# Altium PCB PCB1.PcbDoc (part 2 of 2)
Units mm, origin at the board's own origin, x right, y up, seen from the top; angles counter-clockwise.
Board outline 84.97 x 56 mm, 6 copper layers (Top Layer, L2_GND, L3-PWR, L4-SGN, L5-GND, Bottom Layer), stack 1.452 mm thick; 132 components, 108 nets, 851 pads, 433 vias.
Unrouted connection lines stored in the file: 212.
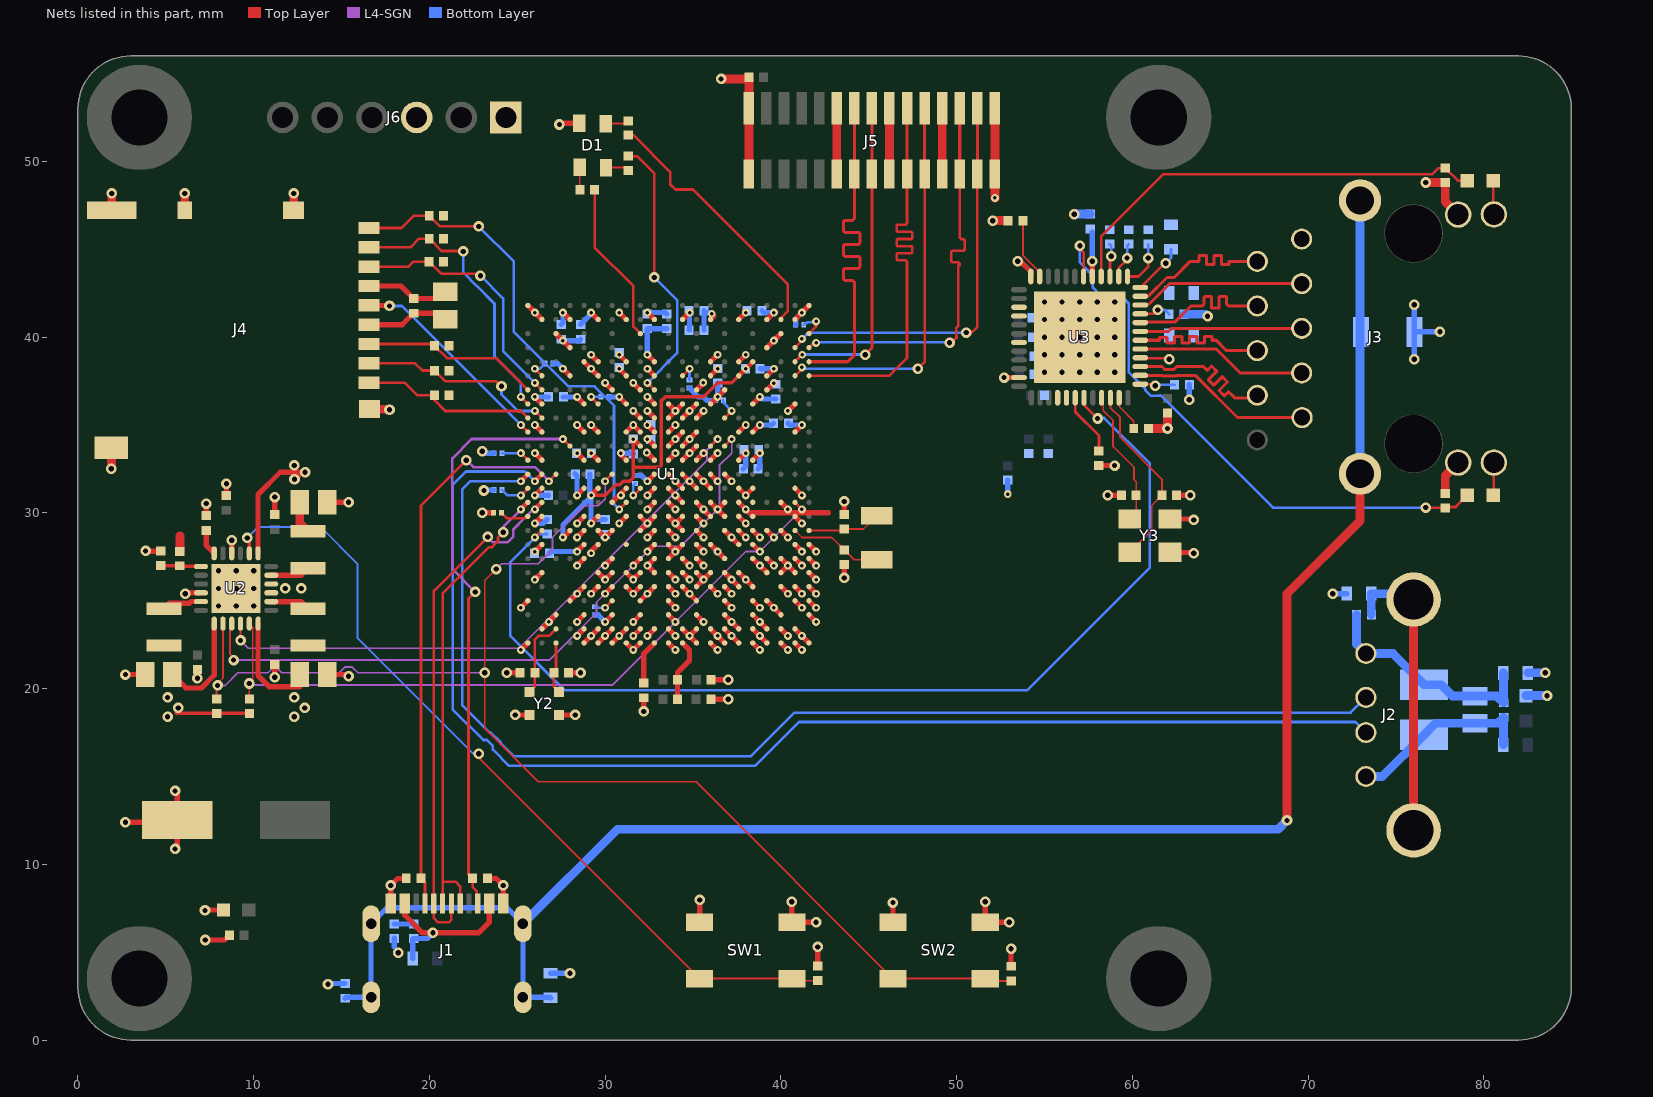
[diagram p6: the nets of this part, all layers, seen from the top]

## Via types
v1: diameter 0.45, hole 0.2, Top Layer to Bottom Layer, 177 vias
v2: diameter 0.6, hole 0.3, Top Layer to Bottom Layer, 161 vias
v3: diameter 0.45, hole 0.2, Top Layer to L2_GND, 59 vias
v4: diameter 0.5, hole 0.3, Top Layer to Bottom Layer, tented both sides, 34 vias
v5: diameter 0.6, hole 0.3, Top Layer to L2_GND, 2 vias

## Nets (pads, with @x,y where several pads share a name; then routed paths per layer and width w, separated by ;. In a path a pad name is that pad's centre, name@x,y a point inside that pad or via, vN(x,y) a via of type N, cw(c..) or ccw(c..) an arc to the next point about the centre after c; other vN are vias at no path point) (continued)
GND: C1.1 C2.1 C4.1 C5.1 C6.1 C7.1 C8.1 C9.1 C10.1 C11.1 C12.1 C13.1 C14.1 C15.1 C16.1 C17.1 C18.1 C19.1 C20.1 C21.1 C22.1 C23.1 C24.1 C25.1 C26.1 C27.1 C28.1 C29.2 C30.1 C31.1 C32.1 C33.1 C34.1 C38.1 C40.1 C41.2 C42.1 C43.2 C44.1 C45.2 C46.1 C47.1 C48.1 C49.2 C50.2 C51.1 C52.2 C53.1 C54.2 C55.1 C56.1 C57.1 C58.1 C59.1 FB2.2 FB4.2 FB5.1 J1.A1/B12 J1.B1/A12 J3.1 J4.G1 J4.G2 J4.G3 J4.G5 J4.G6 J4.P6 J5.1 J5.4 J5.7 J5.10 J6.1 R2.2 R3.2 R4.2 R5.1 R6.1 R7.1 R8.1 R9.2 R11.1 R12.2 R13.1 R15.1 R19.2 R32.1 R33.1 R34.1 R35.1 R36.1 SW1.1 SW1.2 SW2.1 SW2.2 U1.A1 U1.A25 U1.AA1 U1.AA4 U1.AA6 U1.AA8 U1.AA25 U1.B2 U1.B16 U1.B24 U1.C3 U1.C23 U1.D4 U1.D20 U1.D22 U1.E2 U1.E5 U1.E8 U1.E10 U1.E12 U1.E14 U1.E16 U1.E18 U1.E21 U1.F1 U1.F9 U1.F20 U1.G2 U1.G3 U1.G5 U1.G7 U1.G9 U1.H1 U1.H5 U1.H8 U1.H10 U1.H14 U1.H16 U1.H18 U1.H21 U1.J1 U1.J3 U1.J5 U1.J7 U1.J9 U1.J10 U1.J16 U1.K2 U1.K8 U1.K10 U1.K11 U1.K13 U1.K15 U1.K21 U1.L1 U1.L3 U1.L5 U1.L7 U1.L8 U1.L12 U1.L14 U1.L16 U1.L17 U1.L18 U1.M2 U1.M5 U1.M6 U1.M8 U1.M11 U1.M13 U1.M15 U1.M17 U1.M18 U1.N1 U1.N2 U1.N4 U1.N7 U1.N9 U1.N10 U1.N12 U1.N14 U1.N16 U1.N18 U1.P2 U1.P5 U1.P8 U1.P11 U1.P13 U1.P18 U1.P24 U1.R1 U1.R3 U1.R6 U1.R7 U1.R10 U1.R11 U1.R19 U1.T2 U1.T5 U1.T9 U1.T11 U1.T12 U1.T21 U1.U1 U1.U3 U1.U8 U1.U10 U1.U11 U1.U12 U1.U14 U1.U16 U1.U18 U1.V2 U1.V4 U1.V7 U1.V9 U1.V20 U1.V22 U1.V24 U1.W1 U1.W3 U1.W5 U1.W11 U1.W23 U1.Y2 U1.Y5 U1.Y7 U1.Y10 U1.Y12 U1.Y24 U2.9 U2.10 U2.16 U2.22 U2.25 U3.49 Y2.3 Y2.4 Y3.2 Y3.4 | length 185.7
  Top Layer w0.3: v2(2.7,12.4) 5.525,12.4 C29.2@5.65,12.525 ; v2(2.7,20.8) C41.2@3.825,20.8 ; v2(3.847,27.832) 3.859,27.82 R19.2@4.7,27.82 ; v2(5.528,10.875) 5.65,10.997 C29.2@5.65,12.525 ; v2(5.528,14.175) 5.65,14.053 C29.2@5.65,12.525 ; C29.2@5.65,12.4 C29.2@5.65,12.525 ; v2(6.1,25.4) 6.15,25.45 U2.22@7,25.45 ; v2(6.8,20.588) C40.1@6.8,21.08 ; v2(7.248,5.694) 7.253,5.7 8.345,5.7 C31.1@8.616,5.971 ; v2@7.3,7.4 C30.1@8.28,7.4 ; C47.1@7.3,29.84 v2(7.3,30.529) ; C46.1@8.446,30.989 v2(8.446,31.654) ; U2.16@8.75,27.7 v2@8.75,28.4 ; v2(11.2,20.65) C42.1@11.2,21.38 ; C44.1@11.2,29.9 v2(11.2,30.9) ; C43.2@14.175,20.8 15.4,20.8 v2(15.4,20.7) ; C45.2@14.175,30.6 v2(15.4,30.6) ; J4.P6@16.572,42.91 18.39,42.91 C56.1@19.1,42.2 20.525,42.2 C57.1@20.9,42.575 ; J4.G5@16.6,35.91 J4.G5@16.61,35.9 ; J1.A1/B12@17.8,7.765 v2(17.8,8.8) 18.2,9.2 C32.1@18.68,9.2 ; v2(23,30) R2.2@23.64,30 ; C33.1@23.3,9.2 23.8,9.2 v2(24.2,8.8) J1.B1/A12@24.2,7.765 ; v2(24.4,20.9) C2.1@25.16,20.9 ; v2@24.902,18.502 Y2.4@25.684,18.502 ; v3(25.2,22.2) U1.A1@25.6,22.6 ; U1.A25@25.6,41.8 v1(26,41.4) U1.B24@26.4,41 ; v1(26,35) U1.B16@26.4,34.6 ; U1.B2@26.4,23.4 v3(26.8,23.8) U1.C3@27.2,24.2 ; U1.C23@27.2,40.2 v1(27.6,39.8) U1.D22@28,39.4 ; Y2.3@27.384,18.502 v2@28.298,18.502 ; v1(27.6,38.2) U1.D20@28,37.8 ; C8.1@27.92,20.9 v2(28.6,20.9) ; U1.D4@28,25 v3(28.4,25.4) U1.E5@28.8,25.8 ; v3(28.4,23) U1.E2@28.8,23.4 ; v1(28.4,27.8) U1.E8@28.8,28.2 ; v1(28.4,29.4) U1.E10@28.8,29.8 ; v1(28.4,31) U1.E12@28.8,31.4 ; v1(28.4,33.4) U1.E14@28.8,33 ; v1(28.4,35) U1.E16@28.8,34.6 ; v1(28.4,36.6) U1.E18@28.8,36.2 ; U1.E21@28.8,38.6 v1(29.2,38.2) U1.F20@29.6,37.8 ; U1.F1@29.6,22.6 v3(30,23) U1.G2@30.4,23.4 ; U1.F9@29.6,29 v1(30,28.6) U1.G9@30.4,29 ; v3(30,23.8) U1.G3@30.4,24.2 ; v3(30,25.4) U1.G5@30.4,25.8 ; v3(30,27) U1.G7@30.4,27.4 ; v3(30.8,29.4) U1.H10@31.2,29.8 ; v1(30.8,36.6) U1.H18@31.2,36.2 ; v1(30.8,39) U1.H21@31.2,38.6 ; v1(30.9,33.4) 30.85,33.35 U1.H14@31.2,33 ; U1.H1@31.2,22.6 v3(31.6,22.2) U1.J1@32,22.6 ; U1.H5@31.2,25.8 v3(31.6,25.4) U1.J5@32,25.8 ; U1.H16@31.2,34.6 v1(31.6,35) U1.J16@32,34.6 ; v3(31.6,23.8) U1.J3@32,24.2 ; v3(31.6,27) U1.J7@32,27.4 ; U1.J9@32,29 v3(32.4,29.4) ; U1.J10@32,29.8 v3(32.4,29.4) ; v2(32.2,18.7) C4.1@32.2,19.48 ; v3(32.4,23) U1.K2@32.8,23.4 ; v3(32.4,27.8) U1.K8@32.8,28.2 ; v3(32.4,30.2) U1.K11@32.8,30.6 ; v1(32.4,31.8) U1.K13@32.8,32.2 ; v1(32.4,34.2) U1.K15@32.8,33.8 ; v1(32.4,39) U1.K21@32.8,38.6 ; U1.K10@32.8,29.8 v3(32.4,29.4) ; U1.L1@33.6,22.6 v3(34,22.2) ; U1.L3@33.6,24.2 v3(34,23.8) ; U1.L5@33.6,25.8 v3(34,25.4) ; U1.L7@33.6,27.4 v3(34,27.8) ; U1.L8@33.6,28.2 v3(34,27.8) ; U1.L12@33.6,31.4 v3(34,31) U1.M11@34.4,30.6 ; U1.L14@33.6,33 v3(34,33.4) ; U1.L16@33.6,34.6 v3(34,35) ; U1.L17@33.6,35.4 v3(34,35.8) ; U1.L18@33.6,36.2 v3(34,35.8) ; U1.M2@34.4,23.4 v3(34.8,23) ; U1.M5@34.4,25.8 v3(34.8,25.4) U1.N4@35.2,25 ; U1.M6@34.4,26.6 v3(34.8,26.2) ; U1.M8@34.4,28.2 v3(34,27.8) ; U1.M13@34.4,32.2 v3(34.8,31.8) U1.N12@35.2,31.4 ; U1.M15@34.4,33.8 v3(34.8,34.2) U1.N16@35.2,34.6 ; U1.M17@34.4,35.4 v3(34.8,35.8) U1.N18@35.2,36.2 ; U1.M18@34.4,36.2 v3(34,35.8) ; U1.N1@35.2,22.6 v3(34.8,23) ; U1.N2@35.2,23.4 v3(34.8,23) ; U1.N7@35.2,27.4 v3(35.6,27) ; U1.N9@35.2,29 v3(35.6,28.6) ; U1.N10@35.2,29.8 v3(35.6,29.4) ; U1.N14@35.2,33 v3(35.6,33.4) ; SW1.1@35.375,6.7 v2(35.375,7.975) ; U1.P2@36,23.4 v3(36.4,23) U1.R1@36.8,22.6 ; U1.P5@36,25.8 v1(36.4,25.4) ; U1.P8@36,28.2 v1(36.4,27.8) U1.R7@36.8,27.4 ; U1.P11@36,30.6 v3(36.4,30.2) ; U1.P13@36,32.2 v3(36.4,31.8) ; U1.P18@36,36.2 v3(36.4,36.599) ; U1.P24@36,41 36.196,41.196 v1(36.064,41.329) ; R11.1@36.01,20.5 v2(37,20.5) ; C7.1@36.02,19.4 v2(37,19.4) ; v3(36.4,36.599) U1.R19@36.8,37 ; U1.R3@36.8,24.2 v3(37.2,23.8) U1.T2@37.6,23.4 ; U1.R6@36.8,26.6 v1(37.2,26.2) U1.T5@37.6,25.8 ; U1.R10@36.8,29.8 v3(36.4,30.2) ; U1.R11@36.8,30.6 v3(36.4,30.2) ; U1.T9@37.6,29 v3(38,28.6) ; U1.T11@37.6,30.6 38.2,30 42.7,30 ; U1.T12@37.6,31.4 v3(38,31) U1.U12@38.4,31.4 ; U1.T21@37.6,38.6 v1(38,39) ; v3(38,30.2) U1.U10@38.4,29.8 ; U1.U1@38.4,22.6 v3(38.8,22.2) ; U1.U3@38.4,24.2 v3(38.8,23.8) U1.V2@39.2,23.4 ; U1.U8@38.4,28.2 v3(38.8,27.8) ; U1.U14@38.4,33 v1(38.8,33.4) ; U1.U16@38.4,34.6 v1(38.8,35) ; U1.U18@38.4,36.2 v1(38.8,36.6) ; U1.V4@39.2,25 v3(39.6,24.6) U1.W3@40,24.2 ; U1.V7@39.2,27.4 v3(39.6,27) ; U1.V9@39.2,29 v3(39.6,28.6) ; U1.V20@39.2,37.8 v1(39.6,38.2) ; U1.V22@39.2,39.4 v1(39.6,39.8) U1.W23@40,40.2 ; U1.V24@39.2,41 v1(39.6,41.4) ; U1.W1@40,22.6 v3(40.4,22.2) ; U1.W5@40,25.8 v3(40.4,25.4) ; U1.W11@40,30.6 v3(40.4,30.2) ; v2(40.625,7.875) SW1.2@40.625,6.7 v2(42,6.7) ; U1.Y2@40.8,23.4 v3(41.2,23) U1.AA1@41.6,22.6 ; U1.Y5@40.8,25.8 v3(41.2,25.4) ; U1.Y7@40.8,27.4 v3(41.2,27) ; U1.Y10@40.8,29.8 v3(41.2,29.4) ; U1.Y12@40.8,31.4 v1(41.2,31) ; U1.Y24@40.8,41 v1(41.2,41.4) U1.AA25@41.6,41.8 ; U1.AA4@41.6,25 v3(42,24.6) ; U1.AA6@41.6,26.6 v3(42,26.2) ; U1.AA8@41.6,28.2 v3(42,27.8) ; C58.1@42.1,4.22 v2(42.1,5.3) ; v2(43.6,26.3) C5.1@43.6,27.06 ; C6.1@43.6,29.92 43.6,30.64 v2(43.61,30.65) ; SW2.1@46.375,6.7 v2(46.375,7.825) ; v2(51.625,7.875) SW2.2@51.625,6.7 v2(53,6.7) ; C59.1@53.1,4.2 v2(53.1,5.2) ; v2(58.6,31) C53.1@59.38,31 ; v2@61.9,34.9 v2(62,34.8) ; Y3.4@62.15,27.75 v2@63.45,27.75 ; Y3.2@62.15,29.65 v2@63.45,29.65 ; C54.2@62.52,31 v2(63.3,31)
  Top Layer w0.5: v2(1.9,32.504) J4.G6@1.9,33.71 ; J4.G3@1.925,47.21 v2(1.925,48.175) ; J4.G2@6.075,47.21 v2(6.075,48.175) ; J4.G1@12.275,47.21 v2(12.275,48.175) ; J4.G5@16.61,35.9 v2@17.8,35.9 ; J5.10@43.178,49.272 J5.10@43.178,53.023 ; J5.7@46.178,49.272 J5.7@46.178,53.023 ; J5.4@49.178,49.272 J5.4@49.178,53.023 ; v2(52.051,46.629) C48.1@52.931,46.629 ; v1(52.178,47.922) J5.1@52.178,49.272 J5.1@52.178,53.023 ; C52.2@60.92,34.8 v2(62,34.8) R36.1@62,35.69
  Bottom Layer w0.3: v2@14.32,3.22 C34.1@15.2,3.22 ; 18,5.3 R15.1@18,5.79 ; v2(23,33.5) 23.1,33.4 R4.2@23.67,33.4 ; v2(23.1,31.273) 23.1,31.3 R3.2@23.67,31.3 ; C16.1@26.82,27.7 26.92,27.8 v1(28.4,27.8) ; FB2.2@26.9,3.8 v2(28,3.8) ; R8.1@27.03,38.5 27.3,38.5 v1(27.6,38.2) ; v1(27.6,39.8) 28.52,39.8 C23.1@28.6,39.88 ; C27.1@27.62,36.6 v1(28.4,36.6) ; C17.1@28.28,32.22 28.4,32.1 v1(28.4,31) ; R12.2@29.4,24.2 29.6,24.2 v3(30,23.8) ; R7.1@30.23,36.6 v1(30.8,36.6) ; v1(30.9,33.4) 31.56,33.4 C18.1@31.6,33.36 ; R13.1@31.7,32.13 32.07,32.13 v1(32.4,31.8) ; v1(32.4,39) C25.1@32.4,40.48 C9.1@33.5,40.48 ; R6.1@34.8,37.1 35.3,36.6 35.6,36.6 35.8,36.4 R5.1@36.27,36.4 ; C10.1@35.62,40.4 C26.1@35.62,41.5 35.72,41.4 36.064,41.4 v1(36.064,41.329) ; 36.34,36.664 36.4,36.724 C24.1@36.4,37.38 ; C11.1@38.7,32.5 38.8,32.6 v1(38.8,33.4) ; v1(38.8,35) 39.48,35 C22.1@39.58,35.1 ; v1(38.8,36.6) 38.92,36.48 C15.1@39.7,36.48 ; C20.1@38.82,38.2 v1(39.6,38.2) ; C12.1@38.92,41.5 39.02,41.4 v1(39.6,41.4) ; R9.2@40.84,40.7 40.84,41.04 v1(41.2,41.4) ; v2(63.24,36.44) C49.2@63.24,37.3 ; v2(71.4,25.4) FB5.1@72.2,25.4 ; v2(76.048,38.748) C55.1@76.048,40.3 ; v2(76.048,41.848) C55.1@76.048,40.3 ; v2(77.5,40.3) C55.1@76.048,40.3
  Bottom Layer w0.5: v2(56.7,47) C51.1@57.6,47 ; C50.2@62.94,41.3 64.17,41.3 v2(64.28,41.19) ; C38.1@82.4,19.6 v5(83.6,19.6) ; FB4.2@82.5,20.9 v5(83.5,20.9)
  other v2: 14.228,3.175 18.228,4.975 7.228,7.375 24.885,18.502 28.3,18.5 11.8,25.7 12.7,25.7 63.5,27.7 8.757,28.447 63.5,29.6 17.728,35.875
  other v4: 8,24.7 9,24.7 10,24.7 8,25.7 9,25.7 10,25.7 8,26.7 9,26.7 10,26.7 55,38 56,38 57,38 58,38 59,38 55,39 56,39 57,39 58,39 59,39 55,40 56,40 57,40 58,40 59,40 55,41 56,41 57,41 58,41 59,41 55,42 56,42 57,42 58,42 59,42
GND_USBA: C34.2 C55.2 FB2.1 J1.25 J3.0 | length 103.8
  Top Layer w0.5: v2(68.8,12.5) 68.8,25.4 72.961,29.561 J3.0@72.961,32.225
  Bottom Layer w0.3: C34.2@15.2,2.38 15.255,2.435 J1.25@16.68,2.435 J1.25@16.68,6.615 17.6,7.535 24.4,7.535 J1.25@25.32,6.615 J1.25@25.32,2.435 26.865,2.435 FB2.1@26.9,2.4
  Bottom Layer w0.5: J1.25@25.32,6.615 30.705,12 68.3,12 v2(68.8,12.5) ; J3.0@72.961,32.225 J3.0@72.961,47.775
GND_USBB: C39.2 FB5.2 J2.0 | length 16.9
  Top Layer w0.5: J2.0@76,11.93 J2.0@76,25.07
  Bottom Layer w0.5: C39.2@73.6,24.2 FB5.2@73.6,25.4 75.67,25.4 J2.0@76,25.07
LED1: R20.1 R29.1 U3.18 | length 33.7
  Top Layer w0.15: v2(57.016,45.197) 56.975,45.156 56.975,45.061 57.225,44.811 U3.18@57.225,43.45 ; v2(76.7,30.3) 76.71,30.29 R29.1@77.8,30.29 77.847,30.338 78.4,30.338 R20.1@79.062,31
  Bottom Layer w0.15: v2(57.016,45.197) 57.016,44.256 57.5,43.773 57.5,43.736 57.55,43.686 57.75,43.486 57.75,42.813 58.138,42.425 59.275,42.425 59.8,41.9 59.8,40.606 59.8,38 60.732,37.068 60.732,36.999 61.068,36.663 61.545,36.663 61.582,36.7 61.6,36.7 68,30.3 v2(76.7,30.3)
LED2: R21.1 R30.1 U3.16 | length 25
  Top Layer w0.15: U3.16@58.225,43.45 58.225,45.725 61.775,49.275 62.836,49.275 77.075,49.275 77.42,49.62 R30.1@77.8,49.62 78.52,48.9 R21.1@79.062,48.9
LED_BLUE: R45.1 U1.W24 | length 15.2
  Top Layer w0.15: R45.1@31.3,51.49 31.61,51.49 33.7,49.4 33.7,48.7 34,48.4 35,48.4 40.4,43 40.4,41.5 40,41.1 U1.W24@40,41
LED_GREEN: R46.1 U1.J23 | length 9.3
  Top Layer w0.15: R46.1@29.4,48.4 29.4,45.1 31.6,42.9 31.6,40.6 U1.J23@32,40.2
LED_RED: R47.1 U1.K19 | length 15.6
  Top Layer w0.15: R47.1@31.3,50.31 31.31,50.3 31.8,50.3 32.8,49.3 v2(32.8,43.4) ; v1(32.4,37.4) U1.K19@32.8,37
  Bottom Layer w0.15: v1(32.4,37.4) 34.1,39.1 34.1,42.1 v2(32.8,43.4)
LPM: U1.P15 U2.4 | length 34.1
  Top Layer w0.1: v2(9.25,22.74) U2.4@9.25,23.7
  Top Layer w0.15: U1.P15@36,33.8 v1(36.4,34.2)
  L4-SGN w0.1: v2(9.25,22.74) 9.69,22.3 25.1,22.3 35.8,33 35.8,33.6 v1(36.4,34.2)
MIPI_CK_N: J5.8 U1.Y21 | length 18.3
  Top Layer w0.15: U1.Y21@40.813,38.6 40.81,38.604 41.006,38.8 41.013,38.8 v1(41.213,39)
  Top Layer w0.175: v2(44.8,39) 45.178,39.378 J5.8@45.178,49.272 J5.8@45.178,53.023
  Bottom Layer w0.175: v1(41.213,39) 42.9,39 v2(44.8,39)
MIPI_CK_P: J5.9 U1.AA21 | length 21.2
  Top Layer w0.175: U1.AA21@41.6,38.6 43.8,38.6 44.178,38.978 44.178,43.043 44.178,43.13 44.075,43.233 43.638,43.233 43.57,43.301 43.57,43.848 43.638,43.916 44.426,43.916 44.495,43.984 44.495,44.531 44.426,44.599 43.638,44.599 43.57,44.667 43.57,45.214 43.638,45.282 44.426,45.282 44.495,45.35 44.495,45.897 44.426,45.965 43.638,45.965 43.57,46.033 43.57,46.58 43.638,46.648 44.075,46.648 44.178,46.75 44.178,47.452 J5.9@44.178,49.272 J5.9@44.178,53.023
MIPI_D0_N: J5.2 U1.Y22 | length 23.5
  Top Layer w0.15: U1.Y22@40.8,39.4 41.2,39.8 v1(41.2,39.9) ; v2(50.553,40.258) 50.553,40.166 50.766,40.166 51.178,40.578 J5.2@51.178,49.272
  Top Layer w0.175: J5.2@51.178,49.272 J5.2@51.178,53.023
  Bottom Layer w0.15: v1(41.2,39.9) 41.558,40.258 50.224,40.258 50.305,40.258 v2(50.553,40.258)
MIPI_D0_P: J5.3 U1.AA22 | length 23.3
  Top Layer w0.15: U1.AA22@41.6,39.4 41.95,39.75 42,39.7 v1(42,39.676) ; v2(49.6,39.683) 49.6,39.8 49.826,39.8 49.996,39.97 49.996,40.022 49.978,40.041 49.978,40.517 50.091,40.63 50.091,44.088 50.14,44.138 50.178,44.175 ; 50.178,44.1 50.178,44.175 ; J5.3@50.178,49.272 50.178,45.8 50.178,45.667 50.266,45.579 50.393,45.579 50.459,45.513 50.459,44.987 50.393,44.921 49.757,44.921 49.691,44.855 49.691,44.329 49.757,44.263 50.09,44.263 50.178,44.175
  Top Layer w0.175: J5.3@50.178,49.272 J5.3@50.178,53.023
  Bottom Layer w0.15: v1(42,39.676) 42,39.7 49.5,39.7 49.541,39.741 v2(49.6,39.683)
MIPI_D1_N: J5.5 U1.Y20 | length 22.3
  Top Layer w0.15: U1.Y20@40.813,37.8 41.213,38.2 41.213,38.286 41.199,38.286 v1@41.199,38.282 ; v2(47.8,38.2) 48.178,38.578 J5.5@48.178,49.272
  Top Layer w0.175: J5.5@48.178,49.272 J5.5@48.178,53.023
  Bottom Layer w0.15: v1@41.199,38.282 41.199,38.286 41.213,38.286 41.213,38.2 v2(47.8,38.2)
  other v1: 41.198,38.282
MIPI_D1_P: J5.6 U1.AA20 | length 25.5
  Top Layer w0.15: U1.AA20@41.6,37.8 46.156,37.8 47.178,38.822 47.178,43.4 ; 47.178,42.566 47.178,43.4 ; 47.178,46.765 J5.6@47.178,49.272 ; 47.178,46.9 47.178,46.679 47.178,46.479 47.09,46.391 46.635,46.391 46.594,46.35 46.594,46.027 46.635,45.987 47.428,45.987 47.468,45.946 47.468,45.623 47.428,45.583 46.635,45.583 46.594,45.542 46.594,45.219 46.635,45.179 47.428,45.179 47.468,45.138 47.468,44.815 47.428,44.775 46.635,44.775 46.594,44.734 46.594,44.411 46.635,44.371 47.09,44.371 47.178,44.283 47.178,43.4
  Top Layer w0.175: J5.6@47.178,49.272 J5.6@47.178,53.023
NetC48_2: C48.2 U3.23 | length 3.8
  Top Layer w0.1: C48.2@53.721,46.579 C48.2@53.771,46.629 ; C48.2@53.871,46.729 C48.2@53.771,46.629 ; U3.23@54.725,43.45 54.725,43.699 54.3,44.124 53.771,44.654 C48.2@53.771,46.629
NetC52_1: C52.1 U3.47 | length 2.1
  Top Layer w0.1: U3.47@59.25,36.55 59.25,36.05 60.08,35.22 C52.1@60.08,34.8
NetD1_1: D1.1 R45.2 | length 1.3
  Top Layer w0.1: D1.1@30.025,52.15 31.14,52.15 R45.2@31.3,52.31
NetD1_3: D1.3 R46.2 | length 1.3
  Top Layer w0.1: D1.3@28.55,49.675 28.55,48.43 R46.2@28.58,48.4
NetD1_4: D1.4 R47.2 | length 1.3
  Top Layer w0.1: D1.4@30.05,49.65 31.14,49.65 R47.2@31.3,49.49
NetJ3_12: J3.12 R21.2 | length 1.9
  Top Layer w0.15: R21.2@80.538,48.9 80.538,47.02 J3.12@80.571,46.987
NetJ3_14: J3.14 R20.2 | length 1.9
  Top Layer w0.15: R20.2@80.538,31 80.571,31.034 J3.14@80.571,32.862
NetR2_1: R2.1 U1.A10 | length 1.7
  Top Layer w0.15: R2.1@24.1,30 24.3,29.8 24.402,29.698 24.992,29.698 25.408,29.698 25.51,29.8 U1.A10@25.6,29.8
NetR3_1: R3.1 U1.A12 | length 1.8
  Top Layer w0.15: v1(25.2,31) U1.A12@25.6,31.4
  Bottom Layer w0.15: R3.1@24.13,31.3 24.43,31 v1(25.2,31)
NetR4_1: R4.1 U1.A14 | length 1.6
  Top Layer w0.15: v1(25.2,33.4) U1.A14@25.6,33
  Bottom Layer w0.15: R4.1@24.13,33.4 v1(25.2,33.4)
NetR5_2: R5.2 U1.R17 | length 1.4
  Top Layer w0.15: U1.R17@36.8,35.4 v1(37.2,35.8)
  Bottom Layer w0.15: R5.2@36.73,36.4 36.73,36.27 v1(37.2,35.8)
NetR6_2: R6.2 U1.M20 | length 1.2
  Top Layer w0.15: U1.M20@34.4,37.8 v1(34.8,38.2)
  Bottom Layer w0.15: R6.2@34.8,37.56 v1(34.8,38.2)
NetR7_2: R7.2 U1.F18 | length 1.1
  Top Layer w0.15: v1(29.2,36.6) U1.F18@29.6,36.2
  Bottom Layer w0.15: v1(29.2,36.6) R7.2@29.77,36.6
NetR8_2: R8.2 U1.B20 | length 1.3
  Top Layer w0.15: v1(26,38.2) U1.B20@26.4,37.8
  Bottom Layer w0.15: v1(26,38.2) 26.27,38.2 R8.2@26.57,38.5
NetR9_1: R9.1 U1.AA23 | length 1.6
  Top Layer w0.15: U1.AA23@41.6,40.2 42,40.6 42,40.7 v1(42,40.896)
  Bottom Layer w0.15: R9.1@41.3,40.7 41.4,40.8 41.464,40.8 41.51,40.846 41.95,40.846 v1(42,40.896)
NetR12_1: R12.1 U1.G4 | length 1.2
  Top Layer w0.15: v1(30,24.6) U1.G4@30.4,25
  Bottom Layer w0.15: R12.1@29.4,24.66 29.46,24.6 v1(30,24.6)
NetR13_2: R13.2 U1.J12 | length 1.3
  Top Layer w0.15: v1(31.6,31) U1.J12@32,31.4
  Bottom Layer w0.15: v1(31.6,31) 31.6,31.57 R13.2@31.7,31.67
NetR18_1: R18.1 R19.1 U2.19 | length 2.3
  Top Layer w0.2: R19.1@4.7,27 R18.1@5.79,27 ; R18.1@5.8,27.09 5.94,26.95 U2.19@7,26.95
NetR24_1: R24.1 U3.42 | length 3.6
  Top Layer w0.15: U3.42@56.75,36.55 56.75,35.75 58.1,34.4 R24.1@58.1,33.51
NetR27_1: R27.1 U3.14 | length 2
  Top Layer w0.15: U3.14@59.225,43.45 59.225,43.925 v2@59.7,44.4
  Bottom Layer w0.15: v2(59.7,44.5) 59.7,45.19 R27.1@59.8,45.29
NetR28_1: R28.1 U3.13 | length 2.7
  Top Layer w0.15: U3.13@59.725,43.45 60.35,43.45 60.9,44 v2(60.9,44.5)
  Bottom Layer w0.15: v2(60.9,44.5) R28.1@60.9,45.29
NetR31_1: R31.1 U3.15 | length 1.8
  Top Layer w0.15: U3.15@58.725,43.45 58.725,44.425 v2@58.8,44.5
  Bottom Layer w0.15: R31.1@58.7,45.29 58.8,45.19 v2(58.8,44.6)
NRST: C59.2 R17.1 SW2.3 SW2.4 U1.G13 U2.2 | length 75.4
  Top Layer w0.1: R17.1@7.885,19.405 7.885,20.238 8.25,20.603 U2.2@8.25,23.7 ; v2(23.8,26.8) 23.15,26.15 v2(23.15,20.9) 23.15,17.75 26.2,14.7 35.175,14.7 SW2.3@46.375,3.5 SW2.4@51.625,3.5 51.765,3.36 C59.2@53.1,3.36
  Top Layer w0.15: v1(30,31.8) U1.G13@30.4,32.2
  L4-SGN w0.1: v2(7.946,20.178) 8.378,20.178 9.1,20.9 10.814,20.9 11.014,21.1 11.386,21.1 11.586,20.9 14.864,20.9 15.187,21.223 15.613,21.223 15.936,20.9 v2(23.15,20.9) ; v2(23.8,26.8) 24.1,27.1 26.2,27.1 27,27.9 27,28.6 28.8,30.4 29.6,30.4 30,30.8 v1(30,31.8)
NRST_OUT: R1.1 U1.B9 U3.43 | length 59.6
  Top Layer w0.15: v1(26,28.6) U1.B9@26.4,29 ; U3.43@57.25,36.55 57.25,36.141 v2(58.021,35.37)
  Bottom Layer w0.15: R1.1@26.7,28.8 26.2,28.8 v1(26,28.6) 24.6,27.2 24.6,23 27.7,19.9 54,19.9 61,26.9 61,32.8 58.4,35.4 58.051,35.4 v2(58.021,35.37)
nSTART: C58.2 SW1.3 SW1.4 U2.14 | length 46.9
  Top Layer w0.1: v2(22.8,16.3) 22.8,16.075 SW1.3@35.375,3.5 SW1.4@40.625,3.5 40.745,3.38 C58.2@42.1,3.38
  Top Layer w0.2: U2.14@9.75,27.7 v2@9.75,28.55
  Bottom Layer w0.1: v2(9.628,28.575) 10.253,29.2 13.8,29.2 15.9,27.1 15.9,22.9 22.5,16.3 v2(22.8,16.3)
SDMMC1_CD: J4.G4 R42.1 U1.H11 | length 27.6
  Top Layer w0.15: J4.G4@16.572,46.21 18.41,46.21 19.1,46.9 R42.1@19.99,46.9 20.59,46.3 v2(22.8,46.3) ; v1(30.8,30.2) U1.H11@31.2,30.6
  Bottom Layer w0.15: v2(22.8,46.3) 24.8,44.3 24.8,40.3 27.9,37.2 29.4,37.2 30.5,36.1 30.5,32.007 30.5,31.593 30.5,30.5 v1(30.8,30.2)
SDMMC1_CK: J4.P5 U1.A16 | length 12.1
  Top Layer w0.15: v1(25.2,35) U1.A16@25.6,34.6
  Top Layer w0.3: J4.P5@16.572,41.81 16.582,41.8 v2@17.8,41.8
  Bottom Layer w0.15: v2(17.728,41.775) 18.425,41.775 v1(25.2,35)
SDMMC1_CMD: J4.P3 R41.1 U1.A19 | length 10.1
  Top Layer w0.15: J4.P3@16.572,39.61 20.18,39.61 R41.1@20.29,39.5 20.99,38.8 23.8,38.8 U1.A19@25.6,37
SDMMC1_DAT0: J4.P7 R37.1 U1.B19 | length 14.7
  Top Layer w0.15: J4.P7@16.572,44.01 18.81,44.01 19.1,44.3 R37.1@19.98,44.3 20.68,43.6 22.8,43.6 v2(22.9,43.5) ; v1(26,37.4) U1.B19@26.4,37
  Bottom Layer w0.15: v2(22.9,43.5) 24.2,42.2 24.2,39.2 v1(26,37.4)
SDMMC1_DAT1: J4.P8 R38.1 U1.A18 | length 16.1
  Top Layer w0.15: J4.P8@16.572,45.11 18.91,45.11 19.4,45.6 R38.1@19.99,45.6 20.69,44.9 21.903,44.9 v2(21.928,44.875) ; v1(25.2,36.6) U1.A18@25.6,36.2
  Bottom Layer w0.15: v2(21.928,44.875) 21.928,43.672 22.325,43.275 22.325,43.262 22.662,42.925 22.675,42.925 23.7,41.9 23.7,38.9 25.2,37.4 v1(25.2,36.6)
SDMMC1_DAT2: J4.P1 R39.1 U1.A17 | length 10
  Top Layer w0.15: J4.P1@16.572,37.41 18.59,37.41 19.3,36.7 R39.1@20.29,36.7 20.29,36.41 20.9,35.8 25.2,35.8 U1.A17@25.6,35.4
SDMMC1_DAT3: J4.P2 R40.1 U1.B17 | length 11.4
  Top Layer w0.15: J4.P2@16.572,38.51 19.19,38.51 19.6,38.1 R40.1@20.29,38.1 20.89,37.5 23.8,37.5 v2(24.1,37.2) ; v1(26,35.8) U1.B17@26.4,35.4
  Bottom Layer w0.15: v2(24.1,37.2) 24.1,36.736 25.036,35.8 v1(26,35.8)
SHDN: U1.R15 U2.3 | length 38.5
  Top Layer w0.1: U2.3@8.75,23.7 8.65,23.6 8.65,21.953 8.855,21.748 v2(8.855,21.623)
  Top Layer w0.15: U1.R15@36.8,33.8 v1(37.196,34.196)
  L4-SGN w0.1: v2(8.855,21.623) 15.021,21.623 26.823,21.623 29.5,24.3 29.5,24.9 32.7,28.1 34.3,28.1 36.5,30.3 36.5,32.7 37.2,33.4 37.2,34.196 v1(37.196,34.196)
SW1: L1.1 U2.23 | length 2.3
  Top Layer w0.3: L1.1@4.9,24.55 5.2,24.85 5.872,24.85 6.328,24.85 6.428,24.95 U2.23@7,24.95
SW2: L2.1 U2.8 | length 2.3
  Top Layer w0.3: U2.8@11,24.95 12.7,24.95 L2.1@13.1,24.55
SW3: L3.1 U2.11 | length 2.3
  Top Layer w0.3: U2.11@11,26.45 12.704,26.45 L3.1@13.1,26.846
TXRX_A_N: J3.8 U3.3 | length 10.3
  Top Layer w0.175: U3.3@60.45,38.325 61.682,38.325 61.857,38.15 62.343,38.15 62.518,38.325 64.038,38.325 64.192,38.172 64.253,38.11 64.501,38.357 64.805,38.054 64.323,37.572 64.626,37.269 65.108,37.751 65.411,37.447 64.929,36.966 65.233,36.662 65.467,36.896 65.761,36.602 65.816,36.548 66.966,36.548 J3.8@67.111,36.692
TXRX_A_P: J3.9 U3.2 | length 10.2
  Top Layer w0.175: U3.2@60.45,37.825 60.994,37.825 61.619,37.825 61.687,37.825 61.712,37.8 62.488,37.8 62.513,37.825 63.575,37.825 65.978,35.422 J3.9@69.661,35.422
TXRX_B_N: J3.6 U3.6 | length 9.4
  Top Layer w0.175: U3.6@60.45,39.825 61.453,39.825 61.541,39.825 61.541,39.975 61.97,39.975 61.97,39.675 62.399,39.675 62.399,40.047 62.828,40.047 62.828,39.675 63.257,39.675 63.257,40.047 63.686,40.047 63.686,39.675 64.115,39.675 64.115,40.047 64.544,40.047 64.544,39.825 64.735,39.825 64.765,39.825 64.804,39.786 65.358,39.232 J3.6@67.111,39.232
TXRX_B_P: J3.7 U3.5 | length 9.8
  Top Layer w0.175: U3.5@60.45,39.325 64.77,39.325 66.133,37.962 J3.7@69.636,37.962
TXRX_C_N: J3.4 U3.8 | length 9.2
  Top Layer w0.175: U3.8@60.45,40.825 60.477,40.852 62.416,40.852 63.336,41.772 63.89,41.772 63.978,41.772 64.08,41.875 64.08,42.281 64.101,42.303 64.488,42.303 64.509,42.281 64.509,41.672 64.53,41.65 64.917,41.65 64.938,41.672 64.938,42.281 64.959,42.303 65.346,42.303 65.367,42.281 65.367,41.875 65.47,41.772 65.68,41.772 J3.4@67.111,41.772
TXRX_C_P: J3.5 U3.7 | length 9.3
  Top Layer w0.175: U3.7@60.45,40.325 62.061,40.325 62.238,40.502 J3.5@69.636,40.502
TXRX_D_N: J3.2 U3.11 | length 9.6
  Top Layer w0.175: U3.11@60.45,42.325 60.899,42.325 61.966,43.392 62.38,43.392 63.3,44.312 63.7,44.312 63.788,44.312 63.788,44.652 64.217,44.652 64.217,44.126 64.646,44.126 64.646,44.652 65.075,44.652 65.075,44.126 65.504,44.126 65.504,44.312 65.7,44.312 J3.2@67.111,44.312
TXRX_D_P: J3.3 U3.10 | length 9.7
  Top Layer w0.175: U3.10@60.45,41.825 60.894,41.825 61.057,41.988 62.111,43.042 J3.3@69.636,43.042
USBA_CC1: C32.2 J1.A5 U1.C13 | length 32.2
  Top Layer w0.15: J1.A5@19.75,7.765 19.75,8.97 C32.2@19.52,9.2 19.52,30.42 v2(22.1,33) ; v1(26.8,31.8) U1.C13@27.2,32.2
  L4-SGN w0.15: v2(22.1,33) 22.5,32.6 26,32.6 v1(26.8,31.8)
USBA_CC2: C33.2 J1.B5 U1.D15 | length 33.6
  Top Layer w0.15: v2(22.6,25.5) 22.225,25.125 22.225,9.435 C33.2@22.46,9.2 22.46,8.704 22.7,8.464 22.7,7.815 J1.B5@22.75,7.765 ; v1(27.6,34.2) U1.D15@28,33.8
  L4-SGN w0.15: v2(22.6,25.5) 21.3,26.8 21.3,33.1 22.4,34.2 v1(27.6,34.2)
USBA_N: J1.A7 J1.B7 U1.B11 | length 29.4
  Top Layer w0.15: J1.A7@21.25,7.765 21.25,6.85 21.1,6.7 20.5,6.7 20.25,6.95 J1.B7@20.25,7.765 20.25,25.555 v2(23.323,28.628)
  Top Layer w0.254: v1(26,30.2) U1.B11@26.4,30.6
  L4-SGN w0.15: v2(23.323,28.628) 23.626,28.325 24.438,28.325 24.775,28.662 24.775,29.068 25.407,29.7 25.907,30.2 v1(26,30.2)
USBA_P: J1.A6 J1.B6 U1.A11 | length 27
  Top Layer w0.15: J1.A6@20.75,7.765 20.75,9 ; J1.B6@21.75,7.765 21.75,8.75 21.5,9 20.75,9 ; v2(24.2,28.9) 23.898,28.598 23.898,28.39 23.561,28.053 23.385,28.053 20.75,25.419 20.75,9
  Top Layer w0.254: v1(25.2,30.2) U1.A11@25.6,30.6
  L4-SGN w0.15: v2(24.2,28.9) 24.2,29.2 v1(25.2,30.2)
USBA_VBUS_5V: FB1.1 J1.A4/B9 J1.B4/A9 R14.2 | length 9.6
  Top Layer w0.3: J1.A4/B9@18.6,7.765 18.6,7.1 19.6,6.1 v2(20.2,6.1) 22.8,6.1 23.4,6.7 J1.B4/A9@23.4,7.765
  Bottom Layer w0.3: FB1.1@19.05,4.65 19.05,5.73 R14.2@19.1,5.78 19.88,5.78 v2(20.2,6.1)
USBA_VBUS_DETECT: R14.1 R15.2 | length 1.1
  Bottom Layer w0.3: R15.2@18,6.61 18.01,6.6 R14.1@19.1,6.6
USBB_GND: C35.1 C36.1 C37.1 C39.1 FB4.1 J2.4 | length 13.1
  Bottom Layer w0.5: C39.1@72.76,24.2 72.76,22.53 J2.4@73.29,22 74.825,22 C35.1@76.6,20.225 77.575,20.225 78.225,19.575 C36.1@79.5,19.575 80.745,19.575 C37.1@81.125,19.195 81.125,20.875 FB4.1@81.1,20.9
USBB_N: J2.2 U1.B13 | length 73.3
  Top Layer w0.254: v1(26,31.8) U1.B13@26.4,32.2
  Bottom Layer w0.15: v1(26,31.8) 25.72,32.08 25.704,32.08 25.429,32.354 22.095,32.354 21.32,31.58 21.32,19.604 21.32,18.82 23.066,17.075 23.273,17.075 23.61,16.738 23.61,16.531 24.541,15.6 38.527,15.6 41.027,18.1 72.69,18.1 J2.2@73.29,17.5
USBB_P: J2.3 U1.A13 | length 70.4
  Top Layer w0.254: v1(25.2,31.8) U1.A13@25.6,32.2
  Bottom Layer w0.15: v1(25.2,31.8) 22.324,31.8 21.874,31.35 21.874,19.374 21.874,19.05 23.399,17.525 23.46,17.525 24.06,16.925 24.06,16.864 24.77,16.154 38.298,16.154 40.771,18.627 72.417,18.627 J2.3@73.29,19.5
USBB_VBUS_5V: C35.2 C36.2 C37.2 FB3.1 J2.1 | length 10.8
  Bottom Layer w0.5: J2.1@73.29,15 74.225,15 C35.2@76.6,17.375 77.25,18.025 C36.2@79.5,18.025 80.795,18.025 C37.2@81.125,18.355 81.125,16.825 FB3.1@81.1,16.8
VDD_1V8: C47.2 R18.2 U2.18 | length 2.4
  Top Layer w0.3: C47.2@7.3,29 7.3,28.15 U2.18@7.75,27.7
  Top Layer w0.5: R18.2@5.8,27.81 5.8,28.7
VDD_2V5: C1.2 C17.2 C18.2 C20.2 U1.D9 U1.F10 U1.F12 U1.J15 U1.T20 U1.U21 | length 25.5
  Top Layer w0.2: v1(29.2,31) 30,31 30.6,31.6 30.834,31.6 31.034,31.8 31.366,31.8 31.383,31.783 31.6,32 31.6,32.6 ; v1(31.6,34.2) 31.6,32.6 ; U1.T20@37.6,37.8 37.2,37.4 36.966,37.4 36.634,37.4 36.4,37.4 35.6,36.6 33.434,36.6 33.234,36.4 33.2,36.4 33.2,32.7 33.1,32.6 31.6,32.6
  Top Layer w0.3: v1(27.6,28.6) U1.D9@28,29 ; v1(29.2,29.4) U1.F10@29.6,29.8 ; v1(29.2,31) U1.F12@29.6,31.4 ; v1(31.6,34.2) U1.J15@32,33.8 ; U1.T20@37.6,37.8 v1(38,38.2) U1.U21@38.4,38.6
  Bottom Layer w0.3: v1(27.6,28.6) 27.6,29.3 29.2,30.9 v1(29.2,31) ; C17.2@29.12,32.2 29.12,31.08 v1(29.2,31) ; C1.2@30,29.62 29.42,29.62 v1(29.2,29.4) v1(29.2,31)
VDD_3V3: C9.2 C10.2 C16.2 C19.2 C21.2 C22.2 C23.2 C24.2 C25.2 C26.2 C27.2 C28.2 C41.1 C51.2 C56.2 C57.2 D1.2 FB6.1 J3.11 J3.13 J4.P4 J5.15 J6.3 L1.2 R1.2 R16.2 R17.2 R22.2 R23.2 R24.2 R25.2 R26.2 R27.2 R28.2 R29.2 R30.2 R31.2 R37.2 R38.2 R39.2 R40.2 R41.2 R42.2 R43.1 R44.1 U1.B8 U1.B10 U1.B12 U1.B14 U1.B18 U1.D24 U1.F14 U1.F16 U1.F24 U1.H24 U1.K16 U1.K24 U1.M24 U1.P20 U1.Y16 U1.Y18 U2.1 U3.17 U3.24 U3.28 U3.35 U3.41 | length 51.2
  Top Layer w0.2: v2(5.7,18.9) 5.6,18.8 5.6,18.6 R17.2@8.1,18.6 ; R17.2@7.893,18.593 R16.2@9.761,18.593
  Top Layer w0.3: C41.1@5.375,20.8 6.137,20.038 7.028,20.038 7.75,20.76 U2.1@7.75,23.7 ; J4.P4@16.572,40.71 18.45,40.71 C56.2@19.1,41.36 20.565,41.36 C57.2@20.9,41.025 ; v1(26,27.8) U1.B8@26.4,28.2 ; v1(26,29.4) U1.B10@26.4,29.8 ; v1(26,31) U1.B12@26.4,31.4 ; v1(26,33.4) U1.B14@26.4,33 ; v1(26,36.6) U1.B18@26.4,36.2 ; v2(27.4,52.1) 27.475,52.175 D1.2@28.525,52.175 ; v1(27.6,41.4) U1.D24@28,41 ; v1(29.2,33.4) U1.F14@29.6,33 ; v1(29.2,35) U1.F16@29.6,34.6 ; v1(29.2,41.4) U1.F24@29.6,41 ; v1(30.8,41.4) U1.H24@31.2,41 ; v1(32.4,35) U1.K16@32.8,34.6 ; v1(32.4,41.4) U1.K24@32.8,41 ; U1.M24@34.4,41 v1(34.8,41.4) ; U1.P20@36,37.8 v1(36.4,38.2) ; v1(40.4,35.8) U1.Y18@40.8,36.2 ; U1.Y16@40.8,34.6 v1(41.2,35) ; v2(52.7,37.7) U3.35@53.55,37.7 ; v2(53.471,44.317) 53.551,44.397 54.225,43.723 U3.24@54.225,43.45 ; U3.17@57.725,43.45 v2(57.725,44.317) ; R24.2@58.1,32.69 v2(58.99,32.69)
  Top Layer w0.5: v2(36.595,54.695) 38.173,54.695 38.178,54.7 J5.15@38.178,53.023 J5.15@38.178,49.272 ; v2(76.7,48.8) R30.2@77.8,48.8 77.8,47.712 J3.11@78.541,46.972 ; R29.2@77.8,31.11 77.8,32.12 J3.13@78.541,32.862
  Bottom Layer w0.3: v1(26,29.4) 26.48,29.4 R1.2@26.7,29.62 ; v1(26,31) R43.1@26.78,31 ; v1(26,36.6) C27.2@26.78,36.6 ; C28.2@27.5,40.72 27.6,40.82 v1(27.6,41.4) ; C23.2@28.6,40.72 29.2,41.32 v1(29.2,41.4) ; v1(32.4,41.4) 33.42,41.4 C9.2@33.5,41.32 ; C10.2@34.78,40.4 34.8,40.42 v1(34.8,41.4) ; C22.2@40.42,35.1 40.52,35 v1(41.2,35) ; v1(52.907,31.07) R23.2@52.907,31.86 ; v2(57.725,44.317) C51.2@57.725,45.975
  other v2: 5.1,18.4 5.1,19.5
VDDAH: C49.1 FB6.2 U3.1 U3.12 | length 5
  Top Layer w0.15: U3.1@60.45,37.325 61.275,37.325 61.3,37.3 61.3,37.244 v2(61.307,37.238) ; U3.12@60.45,42.825 61.825,44.2 v2(61.9,44.2)
  Bottom Layer w0.15: v2(61.307,37.238) 61.307,37.3 C49.1@62.4,37.3 ; v2(61.9,44.2) 62.2,44.5 FB6.2@62.2,45
VDDAL: C50.1 FB7.2 FB8.1 U3.4 U3.9 | length 3.6
  Top Layer w0.15: U3.4@60.45,38.825 60.475,38.8 62.1,38.8 v2(62.1,38.737) ; U3.9@60.45,41.325 61.225,41.325 v2(61.447,41.547)
  Bottom Layer w0.15: v2(61.447,41.547) 61.853,41.547 C50.1@62.1,41.3
VDDAL_PLL: FB8.2
VDDCORE: C11.2 C12.2 C13.2 C14.2 C15.2 C45.1 FB7.1 L3.2 U1.F21 U1.G11 U1.G19 U1.H12 U1.H20 U1.J17 U1.J19 U1.K17 U1.K18 U1.K20 U1.L13 U1.M12 U1.N17 U1.N19 U1.P21 U1.T14 U1.T16 U1.T24 U1.V19 U2.13 U3.27 U3.31 U3.40 | length 20.8
  Top Layer w0.3: U2.13@10.25,27.7 10.25,31.05 11.511,32.311 v2(12.923,32.311) ; v2(12.323,31.911) v2@12.719,32.307 ; v1(29.2,39) U1.F21@29.6,38.6 ; v1(30,37.4) U1.G19@30.4,37 ; U1.G11@30.4,30.6 30.8,31 30.85,31.05 v1(30.9,31) 30.9,31.1 U1.H12@31.2,31.4 ; v1(30.8,38.2) U1.H20@31.2,37.8 ; v1(31.6,35.8) U1.J17@32,35.4 ; v1(31.6,37.4) U1.J19@32,37 ; v1(32.4,35.8) U1.K17@32.8,35.4 ; v1(32.4,36.6) U1.K18@32.8,36.2 ; v1(32.4,38.2) U1.K20@32.8,37.8 ; U1.L13@33.6,32.2 v1(34,31.8) U1.M12@34.4,31.4 ; U1.N17@35.2,35.4 v1(35.6,35.8) ; U1.N19@35.2,37 35.6,37.4 v1(35.582,37.418) ; U1.P21@36,38.6 v1(36.4,39) ; U1.T14@37.6,33 v1(38,33.4) ; U1.T16@37.6,34.6 v1(38,35) ; U1.T24@37.6,41 v1(38,41.4) ; U1.V19@39.2,37 39.591,37.391 v1(39.6,37.382)
  Top Layer w0.5: C45.1@12.625,30.6 12.625,29.421 L3.2@13.1,28.946
  Bottom Layer w0.3: C11.2@37.86,32.5 38,32.64 v1(38,33.4)
  other v2: 12.3,32.7
VDDIODDR: C3.2 C4.2 C43.1 L2.2 R10.2 U1.A4 U1.AA3 U1.AA5 U1.AA7 U1.B6 U1.E1 U1.E3 U1.E7 U1.E9 U1.F2 U1.F5 U1.F6 U1.F8 U1.G1 U1.G6 U1.H2 U1.H6 U1.J2 U1.J4 U1.J6 U1.K1 U1.K5 U1.K6 U1.K7 U1.K9 U1.K12 U1.K14 U1.L2 U1.L4 U1.L6 U1.L9 U1.L10 U1.L11 U1.L15 U1.M1 U1.M7 U1.M9 U1.M10 U1.M14 U1.M16 U1.N3 U1.N5 U1.N6 U1.N8 U1.N11 U1.N13 U1.N15 U1.P1 U1.P6 U1.P10 U1.P12 U1.P14 U1.R2 U1.R4 U1.R5 U1.R9 U1.R13 U1.T1 U1.T6 U1.T8 U1.T10 U1.U2 U1.U4 U1.U5 U1.U7 U1.U9 U1.V1 U1.V6 U1.W2 U1.W6 U1.W7 U1.W9 U1.Y1 U1.Y4 U1.Y6 U1.Y8 U2.6 | length 54.5
  Top Layer w0.3: U2.6@10.25,23.7 10.25,20.75 10.9,20.1 12.6,20.1 12.625,20.125 C43.1@12.625,20.8 ; v1(25.2,24.6) U1.A4@25.6,25 ; v1(26,26.2) U1.B6@26.4,26.6 ; v1(28.4,23.8) U1.E3@28.8,24.2 ; v1(28.4,27) U1.E7@28.8,27.4 ; v1(28.4,28.6) U1.E9@28.8,29 ; U1.E1@28.8,22.6 v1(29.2,23) U1.F2@29.6,23.4 ; v1(29.2,25.4) U1.F5@29.6,25.8 ; v1(29.2,27.7) 29.2,27.8 U1.F8@29.6,28.2 ; U1.F6@29.6,26.6 v1(30,26.2) U1.G6@30.4,26.6 ; U1.G1@30.4,22.6 v1(30.8,23) U1.H2@31.2,23.4 ; U1.H6@31.2,26.6 v1(31.6,26.2) U1.J6@32,26.6 ; v1(31.6,23) U1.J2@32,23.4 ; U1.J4@32,25 v1(32.4,25.4) U1.K5@32.8,25.8 ; C4.2@32.2,20.32 32.2,22 U1.K1@32.8,22.6 ; v1(32.367,33.433) 32.4,33.4 U1.K14@32.8,33 ; v1(32.4,28.6) U1.K9@32.8,29 ; v1(32.4,31) U1.K12@32.8,31.4 ; U1.K6@32.8,26.6 v1(32.4,27) U1.K7@32.8,27.4 ; U1.L2@33.6,23.4 v1(34,23) ; U1.L4@33.6,25 v1(34,24.6) ; U1.L6@33.6,26.6 v1(34,26.2) ; U1.L9@33.6,29 v1(34,28.6) ; U1.L10@33.6,29.8 v1(34,29.4) ; U1.L11@33.6,30.6 v1(34,30.2) ; U1.L15@33.6,33.8 v1(34,34.2) U1.M16@34.4,34.6 ; C3.2@34.12,19.4 34.12,20.49 R10.2@34.11,20.5 34.11,20.91 34.8,21.6 34.8,22.2 U1.M1@34.4,22.6 ; U1.M7@34.4,27.4 v1(34.8,27) ; U1.M9@34.4,29 v1(34,29.4) ; U1.M10@34.4,29.8 v1(34,29.4) ; U1.M14@34.4,33 v1(34.8,33.4) U1.N15@35.2,33.8 ; U1.N3@35.2,24.2 v1(35.6,23.8) ; U1.N5@35.2,25.8 v1(35.6,26.2) ; U1.N6@35.2,26.6 v1(35.6,26.2) ; U1.N8@35.2,28.2 v1(35.6,27.8) ; U1.N11@35.2,30.6 v1(35.6,30.2) U1.P10@36,29.8 ; U1.N13@35.2,32.2 v1(35.6,31.8) U1.P12@36,31.4 ; U1.P1@36,22.6 v1(36.4,22.2) ; U1.P6@36,26.6 v1(35.6,26.2) ; U1.P14@36,33 v1(36.4,33.4) ; U1.R2@36.8,23.4 v1(37.2,23) U1.T1@37.6,22.6 ; U1.R4@36.8,25 v1(37.2,24.6) ; U1.R5@36.8,25.8 v1(37.2,25.4) ; U1.R9@36.8,29 v1(37.2,28.6) U1.T8@37.6,28.2 ; U1.R13@36.8,32.2 v1(37.2,31.8) ; U1.T6@37.6,26.6 v1(38,26.2) U1.U5@38.4,25.8 ; U1.T10@37.6,29.8 v1(38,29.4) ; U1.U2@38.4,23.4 v1(38.8,23) U1.V1@39.2,22.6 ; U1.U4@38.4,25 v1(38.8,24.6) ; U1.U7@38.4,27.4 v1(38.8,27) U1.V6@39.2,26.6 ; U1.U9@38.4,29 v1(38.8,28.6) ; U1.W2@40,23.4 v1(40.4,23) ; U1.W6@40,26.6 v1(40.4,27) ; U1.W7@40,27.4 v1(40.4,27) ; U1.W9@40,29 v1(40.4,28.6) ; U1.Y1@40.8,22.6 v1(41.2,22.2) ; U1.Y4@40.8,25 v1(41.2,24.6) ; U1.Y6@40.8,26.6 v1(40.4,27) ; U1.Y8@40.8,28.2 v1(41.2,27.8) ; U1.AA3@41.6,24.2 v1(42,23.8) ; U1.AA5@41.6,25.8 v1(42,25.4) ; U1.AA7@41.6,27.4 v1(42,27)
  other v2: 12.3,18.4 12.9,18.9 12.3,19.5
WKUP: R16.1 U1.Y11 U2.5 | length 41.8
  Top Layer w0.1: v2(9.752,20.291) 9.75,19.424 R16.1@9.761,19.413 ; U2.5@9.75,23.7 9.95,23.5 9.95,20.489 v2(9.752,20.291)
  Top Layer w0.15: U1.Y11@40.8,30.6 v1(41.2,30.2)
  L4-SGN w0.1: v2(9.752,20.291) v2@9.843,20.2 ; 11.014,20.2 v2@9.843,20.2 ; v1(41.2,30.2) 38.8,27.8 38,27.8 30.4,20.2 11.536,20.2 11.386,20.2 v2@9.843,20.2
XIN24M: C2.2 U1.C2 Y2.1 | length 4.6
  Top Layer w0.15: Y2.1@25.684,19.802 26,20.118 C2.2@26,20.9 26,22.8 26.2,23 26.8,23 U1.C2@27.2,23.4
XIN32K: C5.2 U1.Y9 Y1.1 | length 5.3
  Top Layer w0.1: U1.Y9@40.8,29 41.2,28.6 42.9,28.6 C5.2@43.6,27.9 44.173,27.327 Y1.1@45.45,27.327
XIN_25M: C54.1 U3.46 Y3.3 | length 10.8
  Top Layer w0.1: U3.46@58.75,36.55 58.75,35.984 59.3,35.434 59.3,34.3 61.68,31.92 C54.1@61.68,31 61.1,30.42 61.1,29 Y3.3@59.85,27.75
XOUT24M: C8.2 U1.C1 Y2.2 | length 3
  Top Layer w0.15: U1.C1@27.2,22.6 27.2,21.02 C8.2@27.08,20.9 27.08,20.105 Y2.2@27.384,19.802
XOUT32K: C6.2 U1.AA9 Y1.2 | length 4.2
  Top Layer w0.1: U1.AA9@41.6,29 43.52,29 C6.2@43.6,29.08 44.703,29.08 Y1.2@45.45,29.827
XOUT_25M: C53.2 U3.45 Y3.1 | length 7.9
  Top Layer w0.1: U3.45@58.25,36.55 58.35,36.45 58.35,35.819 58.9,35.269 58.9,33.78 60.1,32.58 60.1,31.9 60.22,31.78 C53.2@60.22,31 60.22,30.02 Y3.1@59.85,29.65
pads on no net: J1.A8 J1.B8 J3. J3.10 J6.2 J6.6 U1.A5 U1.A6 U1.A7 U1.A8 U1.A9 U1.A15 U1.A20 U1.A21 U1.A22 U1.A23 U1.AA10 U1.AA11 U1.AA17 U1.AA18 U1.AA19 U1.B1 U1.B4 U1.B5 U1.B7 U1.B15 U1.B21 U1.B22 U1.B25 U1.C5 U1.C7 U1.C9 U1.C11 U1.C15 U1.C17 U1.C19 U1.C21 U1.C24 U1.C25 U1.D1 U1.D2 U1.D7 U1.D13 U1.D17 U1.D19 U1.D25 U1.E11 U1.E13 U1.E15 U1.E17 U1.E19 U1.E22 U1.E23 U1.E24 U1.E25 U1.F11 U1.F13 U1.F17 U1.F25 U1.G15 U1.G17 U1.G20 U1.G21 U1.G22 U1.G23 U1.G24 U1.H13 U1.H15 U1.H25 U1.J11 U1.J13 U1.J14 U1.J18 U1.J21 U1.J22 U1.J24 U1.J25 U1.K25 U1.L19 U1.L20 U1.L21 U1.L22 U1.L23 U1.L24 U1.L25 U1.M19 U1.M21 U1.M25 U1.N20 U1.N21 U1.N22 U1.N23 U1.N24 U1.N25 U1.P16 U1.P25 U1.R20 U1.R22 U1.R23 U1.R24 U1.R25 U1.T13 U1.T15 U1.T25 U1.U13 U1.U15 U1.U19 U1.U22 U1.U23 U1.U24 U1.U25 U1.V11 U1.V13 U1.V17 U1.V25 U1.W17 U1.W19 U1.W20 U1.W21 U1.W25 U1.Y19 U1.Y25 U2.15 U2.20 U3.44

## Polygon pours and split planes (outlines as drawn)
VDD_1V8 on Top Layer "VDD_1V8_L01_P000" (solid, remove dead copper, pour order 0): 5.3,29.5 7.8,29.5 7.8,28.5 5.3,28.5
VDD_3V3 on Top Layer "VDD_3V3_L01_P003" (solid, remove dead copper, pour order 3): 4.8,22.8 4.8,18 6,18 6,22.8 5.9,22.8
VDDIODDR on Top Layer "VDDIODDR_L01_P004" (solid, remove dead copper, pour order 4): 12,22.8 12,18 13.2,18 13.2,22.8 13.1,22.8
5V_MAIN on Top Layer "5V_MAIN_L01_P008" (solid, remove dead copper, pour order 8): 7.857,30.62 7.896,30.62 9.096,30.62 9.096,28.827 7.857,28.827
GND on Top Layer "GND_L01_P010" (solid, remove dead copper, pour order 10): 9,5 9,14.6 1.9,14.6 1.9,6.8 6.9,6.8 6.9,5 7.4,5
5V_MAIN on Top Layer "5V_MAIN_L01_P011" (solid, remove dead copper, pour order 11): 9,5 9,14.6 15.4,14.6 15.4,8.2 11.5,8.2 11.5,5
5V_MAIN on Top Layer "5V_MAIN_L01_P007" (solid, remove dead copper, pour order 7): 6.3,24.6 7.4,24.6 7.4,21.5 6.3,21.5
5V_MAIN on Top Layer "5V_MAIN_L01_P006" (solid, remove dead copper, pour order 6): 10.6,24.6 11.7,24.6 11.7,21.9 10.6,21.9
5V_MAIN on Top Layer "5V_MAIN_L01_P005" (solid, remove dead copper, pour order 5): 10.6,29.4 11.7,29.4 11.7,26.8 10.6,26.8
GND on Top Layer "GND_L01_P002" (solid, remove dead copper, pour order 2): 10.5,26.2 13.4,26.2 13.4,25.2 10.5,25.2
VDDCORE on Top Layer "VDDCORE_L01_P001" (solid, remove dead copper, pour order 1): 12,28.6 13.2,28.6 13.2,29.6 13.2,33 12,33 13.1,33 12,33
GND on Bottom Layer "GND_L06_P014" (solid, remove dead copper, pour order 14): 54,40.4 54,37.5 55.3,37.5 55.3,40.5 54,40.5
VDD_3V3 on Bottom Layer "VDD_3V3_L06_P012" (solid, remove dead copper, pour order 12): 57.3,46.6 63.1,46.6 63.1,45.6 57.3,45.6
VDDAL on Bottom Layer "VDDAL_L06_P013" (solid, remove dead copper, pour order 13): 61.6,43.2 62.7,43.2 62.7,38.5 61.6,38.5
GND on L5-GND (split plane): 82.192,55.482 82.408,55.454 82.62,55.407 82.827,55.342 83.028,55.258 83.221,55.158 83.404,55.041 83.577,54.909 83.737,54.762 83.884,54.602 84.016,54.429 84.133,54.246 84.233,54.053 84.317,53.852 84.382,53.645 84.429,53.433 84.457,53.217 84.466,53.016 84.465,53 84.465,3 84.466,2.984 84.457,2.783 84.429,2.567 84.382,2.355 84.317,2.148 84.233,1.947 84.133,1.754 84.016,1.571 83.884,1.398 83.737,1.238 83.577,1.091 83.404,0.959 83.221,0.842 83.028,0.742 82.827,0.658 82.62,0.593 82.408,0.546 82.192,0.518 81.991,0.509 81.975,0.51 3,0.51 2.984,0.509 2.783,0.518 2.567,0.546 2.355,0.593 2.148,0.658 1.947,0.742 1.754,0.842 1.571,0.959 1.398,1.091 1.238,1.238 1.091,1.398 0.959,1.571 0.842,1.754 0.742,1.947 0.658,2.148 0.593,2.355 0.546,2.567 0.518,2.783 0.509,2.984 0.51,3 0.51,53 0.509,53.016 0.518,53.217 0.546,53.433 0.593,53.645 0.658,53.852 0.742,54.053 0.842,54.246 0.959,54.429 1.091,54.602 1.238,54.762 1.398,54.909 1.571,55.041 1.754,55.158 1.947,55.258 2.148,55.342 2.355,55.407 2.567,55.454 2.783,55.482 2.984,55.491 3,55.49 81.975,55.49 81.991,55.491
5V_MAIN on L3-PWR (split plane): 11.87,17.7 11.88,17.65 11.908,17.608 11.95,17.58 12,17.571 12.07,17.571 12.07,17.5 12.08,17.45 12.108,17.408 12.15,17.38 12.2,17.371 42.5,17.371 42.55,17.38 42.592,17.408 42.62,17.45 42.629,17.5 42.629,17.571 42.9,17.571 42.95,17.58 42.992,17.608 43.02,17.65 43.029,17.7 43.029,18.67 51.8,18.67 84.465,18.572 84.465,3 84.466,2.984 84.457,2.783 84.429,2.567 84.382,2.355 84.317,2.148 84.233,1.947 84.133,1.754 84.016,1.571 83.884,1.398 83.737,1.238 83.577,1.091 83.404,0.959 83.221,0.842 83.028,0.742 82.827,0.658 82.62,0.593 82.408,0.546 82.192,0.518 81.991,0.509 81.975,0.51 3,0.51 2.984,0.509 2.783,0.518 2.567,0.546 2.355,0.593 2.148,0.658 1.947,0.742 1.754,0.842 1.571,0.959 1.398,1.091 1.238,1.238 1.091,1.398 0.959,1.571 0.842,1.754 0.742,1.947 0.658,2.148 0.593,2.355 0.546,2.567 0.518,2.783 0.509,2.984 0.51,3 0.51,17.671 6.4,17.671 6.45,17.68 6.492,17.708 6.52,17.75 6.529,17.8 6.529,30.371 11.87,30.371
VDD_3V3 on L3-PWR (split plane): 82.192,55.482 82.408,55.454 82.62,55.407 82.827,55.342 83.028,55.258 83.221,55.158 83.404,55.041 83.577,54.909 83.737,54.762 83.884,54.602 84.016,54.429 84.133,54.246 84.233,54.053 84.317,53.852 84.382,53.645 84.429,53.433 84.457,53.217 84.466,53.016 84.465,53 84.465,18.831 51.8,18.929 43.029,18.929 43.029,34.2 43.029,34.8 43.02,34.85 42.992,34.892 42.95,34.92 42.9,34.929 40.93,34.929 40.93,42.3 40.92,42.35 40.892,42.392 40.85,42.42 40.8,42.429 24.6,42.429 24.55,42.42 24.508,42.392 24.48,42.35 24.471,42.3 24.471,35.429 12.3,35.429 12.25,35.42 12.208,35.392 11.908,35.092 11.88,35.05 11.87,35 11.87,30.63 6.4,30.63 6.35,30.62 6.308,30.592 6.28,30.55 6.271,30.5 6.271,17.93 0.51,17.93 0.51,53 0.509,53.016 0.518,53.217 0.546,53.433 0.593,53.645 0.658,53.852 0.742,54.053 0.842,54.246 0.959,54.429 1.091,54.602 1.238,54.762 1.398,54.909 1.571,55.041 1.754,55.158 1.947,55.258 2.148,55.342 2.355,55.407 2.567,55.454 2.783,55.482 2.984,55.491 3,55.49 81.975,55.49 81.991,55.491
5V_MAIN on L3-PWR (split plane): 42.771,17.829 42.629,17.829 42.629,18.67 42.771,18.67
VDDCORE on L3-PWR (split plane): 40.671,34.924 40.65,34.92 40.608,34.892 40.58,34.85 40.576,34.829 32,34.829 31.95,34.82 31.908,34.792 31.88,34.75 31.871,34.7 31.871,30.779 24.604,30.779 24.492,30.892 24.45,30.92 24.4,30.929 24.35,30.92 24.308,30.892 24.28,30.85 24.271,30.8 24.271,26.329 12.129,26.329 12.129,30.5 12.129,34.946 12.354,35.171 24.6,35.171 24.65,35.18 24.692,35.208 24.72,35.25 24.729,35.3 24.729,42.171 40.671,42.171
VDDIODDR on L3-PWR (split plane): 42.771,34.2 42.771,18.929 42.5,18.929 42.45,18.919 42.408,18.891 42.38,18.849 42.371,18.799 42.371,17.829 12.329,17.829 12.329,22.9 12.329,25.871 24.5,25.871 24.55,25.88 24.592,25.908 24.62,25.95 24.629,26 24.629,30.371 31.8,30.371 31.828,30.376 31.85,30.38 31.872,30.396 31.892,30.408 32.042,30.558 32.044,30.561 32.192,30.708 32.22,30.75 32.23,30.8 32.23,34.346 32.354,34.47 40.6,34.47 40.625,34.475 40.65,34.48 40.671,34.494 40.692,34.508 40.792,34.608 40.854,34.67 42.771,34.67
GND on L2_GND (split plane): 82.192,55.482 82.408,55.454 82.62,55.407 82.827,55.342 83.028,55.258 83.221,55.158 83.404,55.041 83.577,54.909 83.737,54.762 83.884,54.602 84.016,54.429 84.133,54.246 84.233,54.053 84.317,53.852 84.382,53.645 84.429,53.433 84.457,53.217 84.466,53.016 84.465,53 84.465,3 84.466,2.984 84.457,2.783 84.429,2.567 84.382,2.355 84.317,2.148 84.233,1.947 84.133,1.754 84.016,1.571 83.884,1.398 83.737,1.238 83.577,1.091 83.404,0.959 83.221,0.842 83.028,0.742 82.827,0.658 82.62,0.593 82.408,0.546 82.192,0.518 81.991,0.509 81.975,0.51 3,0.51 2.984,0.509 2.783,0.518 2.567,0.546 2.355,0.593 2.148,0.658 1.947,0.742 1.754,0.842 1.571,0.959 1.398,1.091 1.238,1.238 1.091,1.398 0.959,1.571 0.842,1.754 0.742,1.947 0.658,2.148 0.593,2.355 0.546,2.567 0.518,2.783 0.509,2.984 0.51,3 0.51,53 0.509,53.016 0.518,53.217 0.546,53.433 0.593,53.645 0.658,53.852 0.742,54.053 0.842,54.246 0.959,54.429 1.091,54.602 1.238,54.762 1.398,54.909 1.571,55.041 1.754,55.158 1.947,55.258 2.148,55.342 2.355,55.407 2.567,55.454 2.783,55.482 2.984,55.491 3,55.49 81.975,55.49 81.991,55.491

## Other copper
L3-PWR (plane layer: these items are gaps in the copper):
  lines w0.254: 0,25.9 0,32.6 ; 0.2,17.8 6.4,17.8 6.4,30.5 12,30.5 ; 12,26.2 24.4,26.2 24.4,30.8 24.55,30.65 31.95,30.65 ; 40.7,34.8 42.9,34.8 42.9,34.2 42.9,17.7 12,17.7 12,30.5 ; 85,18.7 51.8,18.799 45.699,18.799 44.401,18.799 42.5,18.799 42.5,17.5 12.2,17.5 12.2,22.9 12.2,26 24.5,26 24.5,30.5 31.8,30.5 31.95,30.65 ; 12,30.5 12,35 12.3,35.3 24.6,35.3 24.6,42.3 40.3,42.3 40.8,42.3 40.8,34.8 40.7,34.7 ; 31.95,30.65 32,30.7 32,34.7 40.7,34.7 ; 31.95,30.65 32.1,30.8 32.1,34.4 32.3,34.6 40.6,34.6 40.7,34.7

## Silkscreen, mask and mechanical layers (free items; w line width, h text height)
Board Shape:
  the board outline again, w0.254